# Altium PCB HX PJ-320A-3P DIP.pcbdoc
Units mm, origin at the board's own origin, x right, y up, seen from the top; angles counter-clockwise.
Board outline 26.86 x 18.76 mm, 2 copper layers (Top Layer, Bottom Layer), stack 0 mm thick; 1 components, 0 nets, 3 pads, 0 vias.
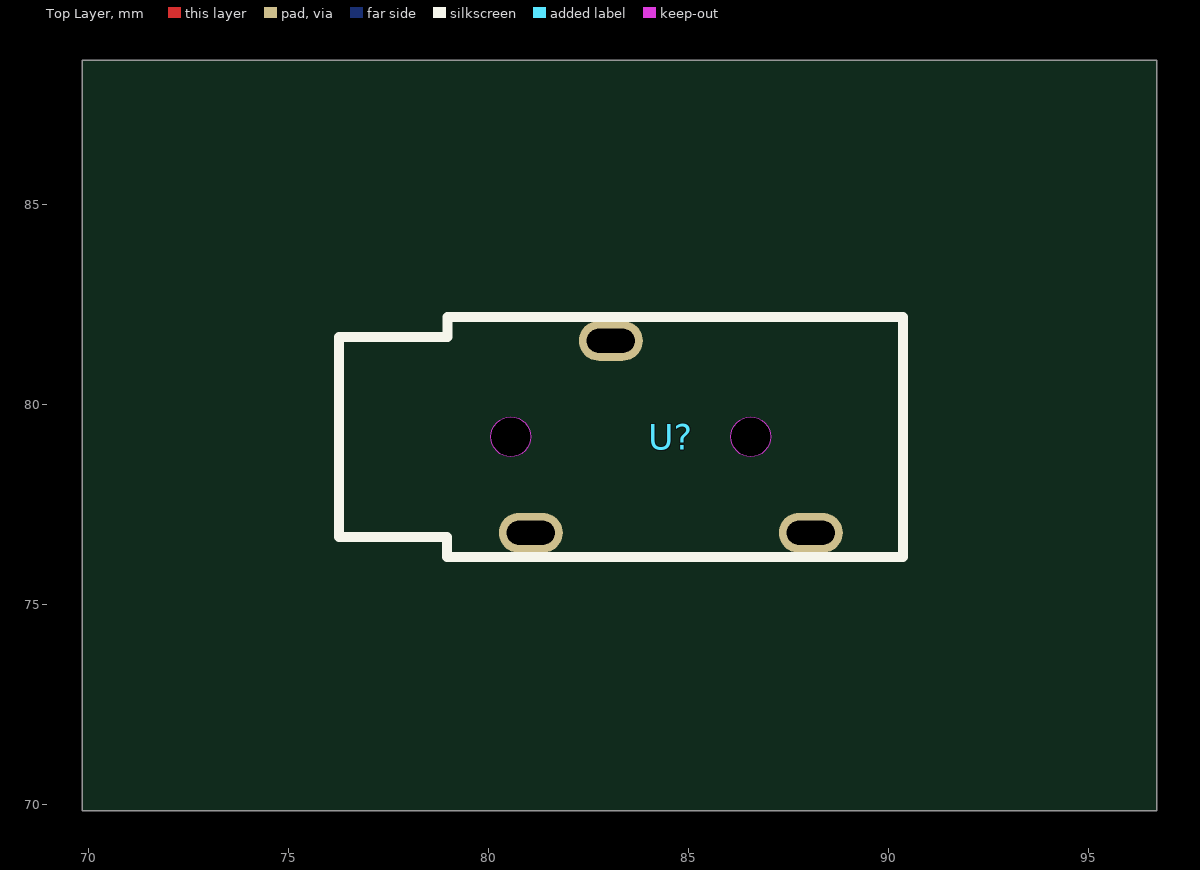
[diagram p0: Top Layer view]
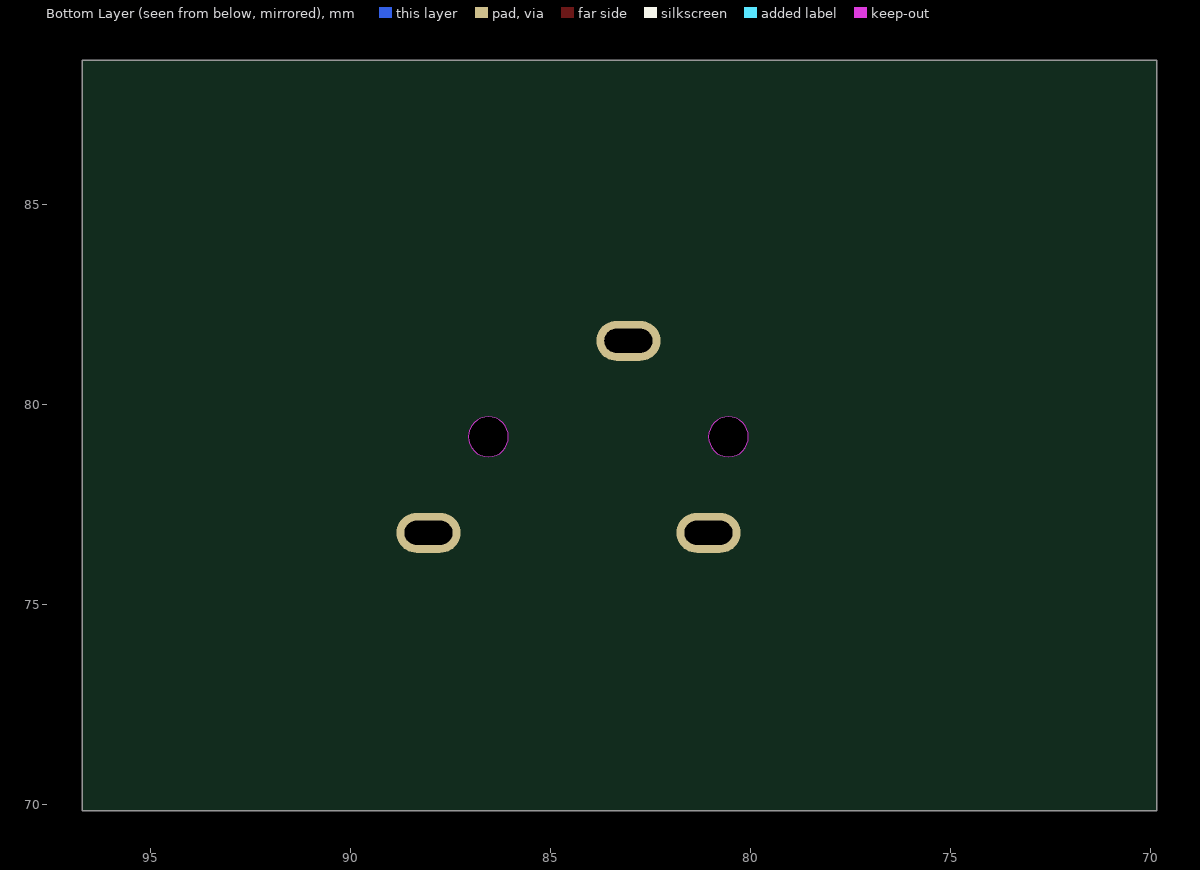
[diagram p1: Bottom Layer view, seen from below]

## Layer stack, top to bottom
Top Layer: signal copper (thickness not stored)
Bottom Layer: signal copper (thickness not stored)

## Board outline
96.71,69.85 69.85,69.85 69.85,88.61 96.71,88.61

## Components (designator, comment, footprint, x,y, rotation, side; value= is the part's Value field where it differs from the comment)
U? "HX PJ-320A-3P DIP" AUDIO-SMD_HX-PJ-320A-3P-DIP 84.559,79.2 r0 top

## Footprints (in the part's own frame and the unit in brackets; to place one, negate y for a bottom-side part, rotate by r counter-clockwise, add the part's x,y. Pads: shape width x height; smd on the part's side, far side on the other; paste and mask are expansions set on the pad)
AUDIO-SMD_HX-PJ-320A-3P-DIP [mil]
  oval 63x39.4 hole 23.6 slot 47.2 at 0 deg: 2(-59,94.5) 3(-137.8,-94.5) 4(137.8,-94.5)
  Board Outline Layer lines w0.1: -177.1,0 -176.7,-3.8 -175.6,-7.5 -173.8,-10.9 -171.4,-13.9 -168.4,-16.4 -165,-18.2 -161.3,-19.3 -157.4,-19.7 -153.6,-19.3 -149.9,-18.2 -146.5,-16.4 -143.5,-13.9 -141.1,-10.9 -139.3,-7.5 -138.1,-3.8 -137.8,0 -138.1,3.9 -139.3,7.5 -141.1,10.9 -143.5,13.9 -146.5,16.4 -149.9,18.2 -153.6,19.3 -157.4,19.7 -161.3,19.3 -165,18.2 -168.4,16.4 -171.4,13.9 -173.8,10.9 -175.6,7.5 -176.7,3.9 -177.1,0 ; 59.1,0 59.5,-3.8 60.6,-7.5 62.4,-10.9 64.9,-13.9 67.8,-16.4 71.2,-18.2 74.9,-19.3 78.8,-19.7 82.6,-19.3 86.3,-18.2 89.7,-16.4 92.7,-13.9 95.1,-10.9 97,-7.5 98.1,-3.8 98.5,0 98.1,3.9 97,7.5 95.1,10.9 92.7,13.9 89.7,16.4 86.3,18.2 82.6,19.3 78.8,19.7 74.9,19.3 71.2,18.2 67.8,16.4 64.9,13.9 62.4,10.9 60.6,7.5 59.5,3.9 59.1,0
  Board Outline Layer region: -137.8,0 -138.1,-3.8 -139.3,-7.5 -141.1,-10.9 -143.5,-13.9 -146.5,-16.4 -149.9,-18.2 -153.6,-19.3 -157.4,-19.7 -161.3,-19.3 -165,-18.2 -168.4,-16.4 -171.4,-13.9 -173.8,-10.9 -175.6,-7.5 -176.7,-3.8 -177.1,0 -176.7,3.9 -175.6,7.5 -173.8,10.9 -171.4,13.9 -168.4,16.4 -165,18.2 -161.3,19.3 -157.4,19.7 -153.6,19.3 -149.9,18.2 -146.5,16.4 -143.5,13.9 -141.1,10.9 -139.3,7.5 -138.1,3.9
  Board Outline Layer region: -137.8,0 -138.1,-3.8 -139.3,-7.5 -141.1,-10.9 -143.5,-13.9 -146.5,-16.4 -149.9,-18.2 -153.6,-19.3 -157.4,-19.7 -161.3,-19.3 -165,-18.2 -168.4,-16.4 -171.4,-13.9 -173.8,-10.9 -175.6,-7.5 -176.7,-3.8 -177.1,0 -176.7,3.9 -175.6,7.5 -173.8,10.9 -171.4,13.9 -168.4,16.4 -165,18.2 -161.3,19.3 -157.4,19.7 -153.6,19.3 -149.9,18.2 -146.5,16.4 -143.5,13.9 -141.1,10.9 -139.3,7.5 -138.1,3.9
  Board Outline Layer region: 98.5,0 98.1,-3.8 97,-7.5 95.1,-10.9 92.7,-13.9 89.7,-16.4 86.3,-18.2 82.6,-19.3 78.8,-19.7 74.9,-19.3 71.2,-18.2 67.8,-16.4 64.9,-13.9 62.4,-10.9 60.6,-7.5 59.5,-3.8 59.1,0 59.5,3.9 60.6,7.5 62.4,10.9 64.9,13.9 67.8,16.4 71.2,18.2 74.9,19.3 78.8,19.7 82.6,19.3 86.3,18.2 89.7,16.4 92.7,13.9 95.1,10.9 97,7.5 98.1,3.9
  Board Outline Layer region: 98.5,0 98.1,-3.8 97,-7.5 95.1,-10.9 92.7,-13.9 89.7,-16.4 86.3,-18.2 82.6,-19.3 78.8,-19.7 74.9,-19.3 71.2,-18.2 67.8,-16.4 64.9,-13.9 62.4,-10.9 60.6,-7.5 59.5,-3.8 59.1,0 59.5,3.9 60.6,7.5 62.4,10.9 64.9,13.9 67.8,16.4 71.2,18.2 74.9,19.3 78.8,19.7 82.6,19.3 86.3,18.2 89.7,16.4 92.7,13.9 95.1,10.9 97,7.5 98.1,3.9
  Multi-Layer board cut-out: -137.8,0 -138.1,-3.8 -139.3,-7.5 -141.1,-10.9 -143.5,-13.9 -146.5,-16.4 -149.9,-18.2 -153.6,-19.3 -157.4,-19.7 -161.3,-19.3 -165,-18.2 -168.4,-16.4 -171.4,-13.9 -173.8,-10.9 -175.6,-7.5 -176.7,-3.8 -177.1,0 -176.7,3.9 -175.6,7.5 -173.8,10.9 -171.4,13.9 -168.4,16.4 -165,18.2 -161.3,19.3 -157.4,19.7 -153.6,19.3 -149.9,18.2 -146.5,16.4 -143.5,13.9 -141.1,10.9 -139.3,7.5 -138.1,3.9
  Multi-Layer board cut-out: 98.5,0 98.1,-3.8 97,-7.5 95.1,-10.9 92.7,-13.9 89.7,-16.4 86.3,-18.2 82.6,-19.3 78.8,-19.7 74.9,-19.3 71.2,-18.2 67.8,-16.4 64.9,-13.9 62.4,-10.9 60.6,-7.5 59.5,-3.8 59.1,0 59.5,3.9 60.6,7.5 62.4,10.9 64.9,13.9 67.8,16.4 71.2,18.2 74.9,19.3 78.8,19.7 82.6,19.3 86.3,18.2 89.7,16.4 92.7,13.9 95.1,10.9 97,7.5 98.1,3.9
  silkscreen extent -327,-118 228,118

## Nets (pads, with @x,y where several pads share a name; then routed paths per layer and width w, separated by ;. In a path a pad name is that pad's centre, name@x,y a point inside that pad or via, vN(x,y) a via of type N, cw(c..) or ccw(c..) an arc to the next point about the centre after c; other vN are vias at no path point)
pads on no net: U?.2 U?.3 U?.4